# Altium PCB SYNCBOX.PcbDoc (part 5 of 6)
Units mil, origin at the board's own origin, x right, y up, seen from the top; angles counter-clockwise.
Board outline 8392.2 x 6163.59 mil, 6 copper layers (L1, L2, L3, L4 (PWR), L5, L6), stack 60.709 mil thick; 316 components, 422 nets, 1421 pads, 499 vias.
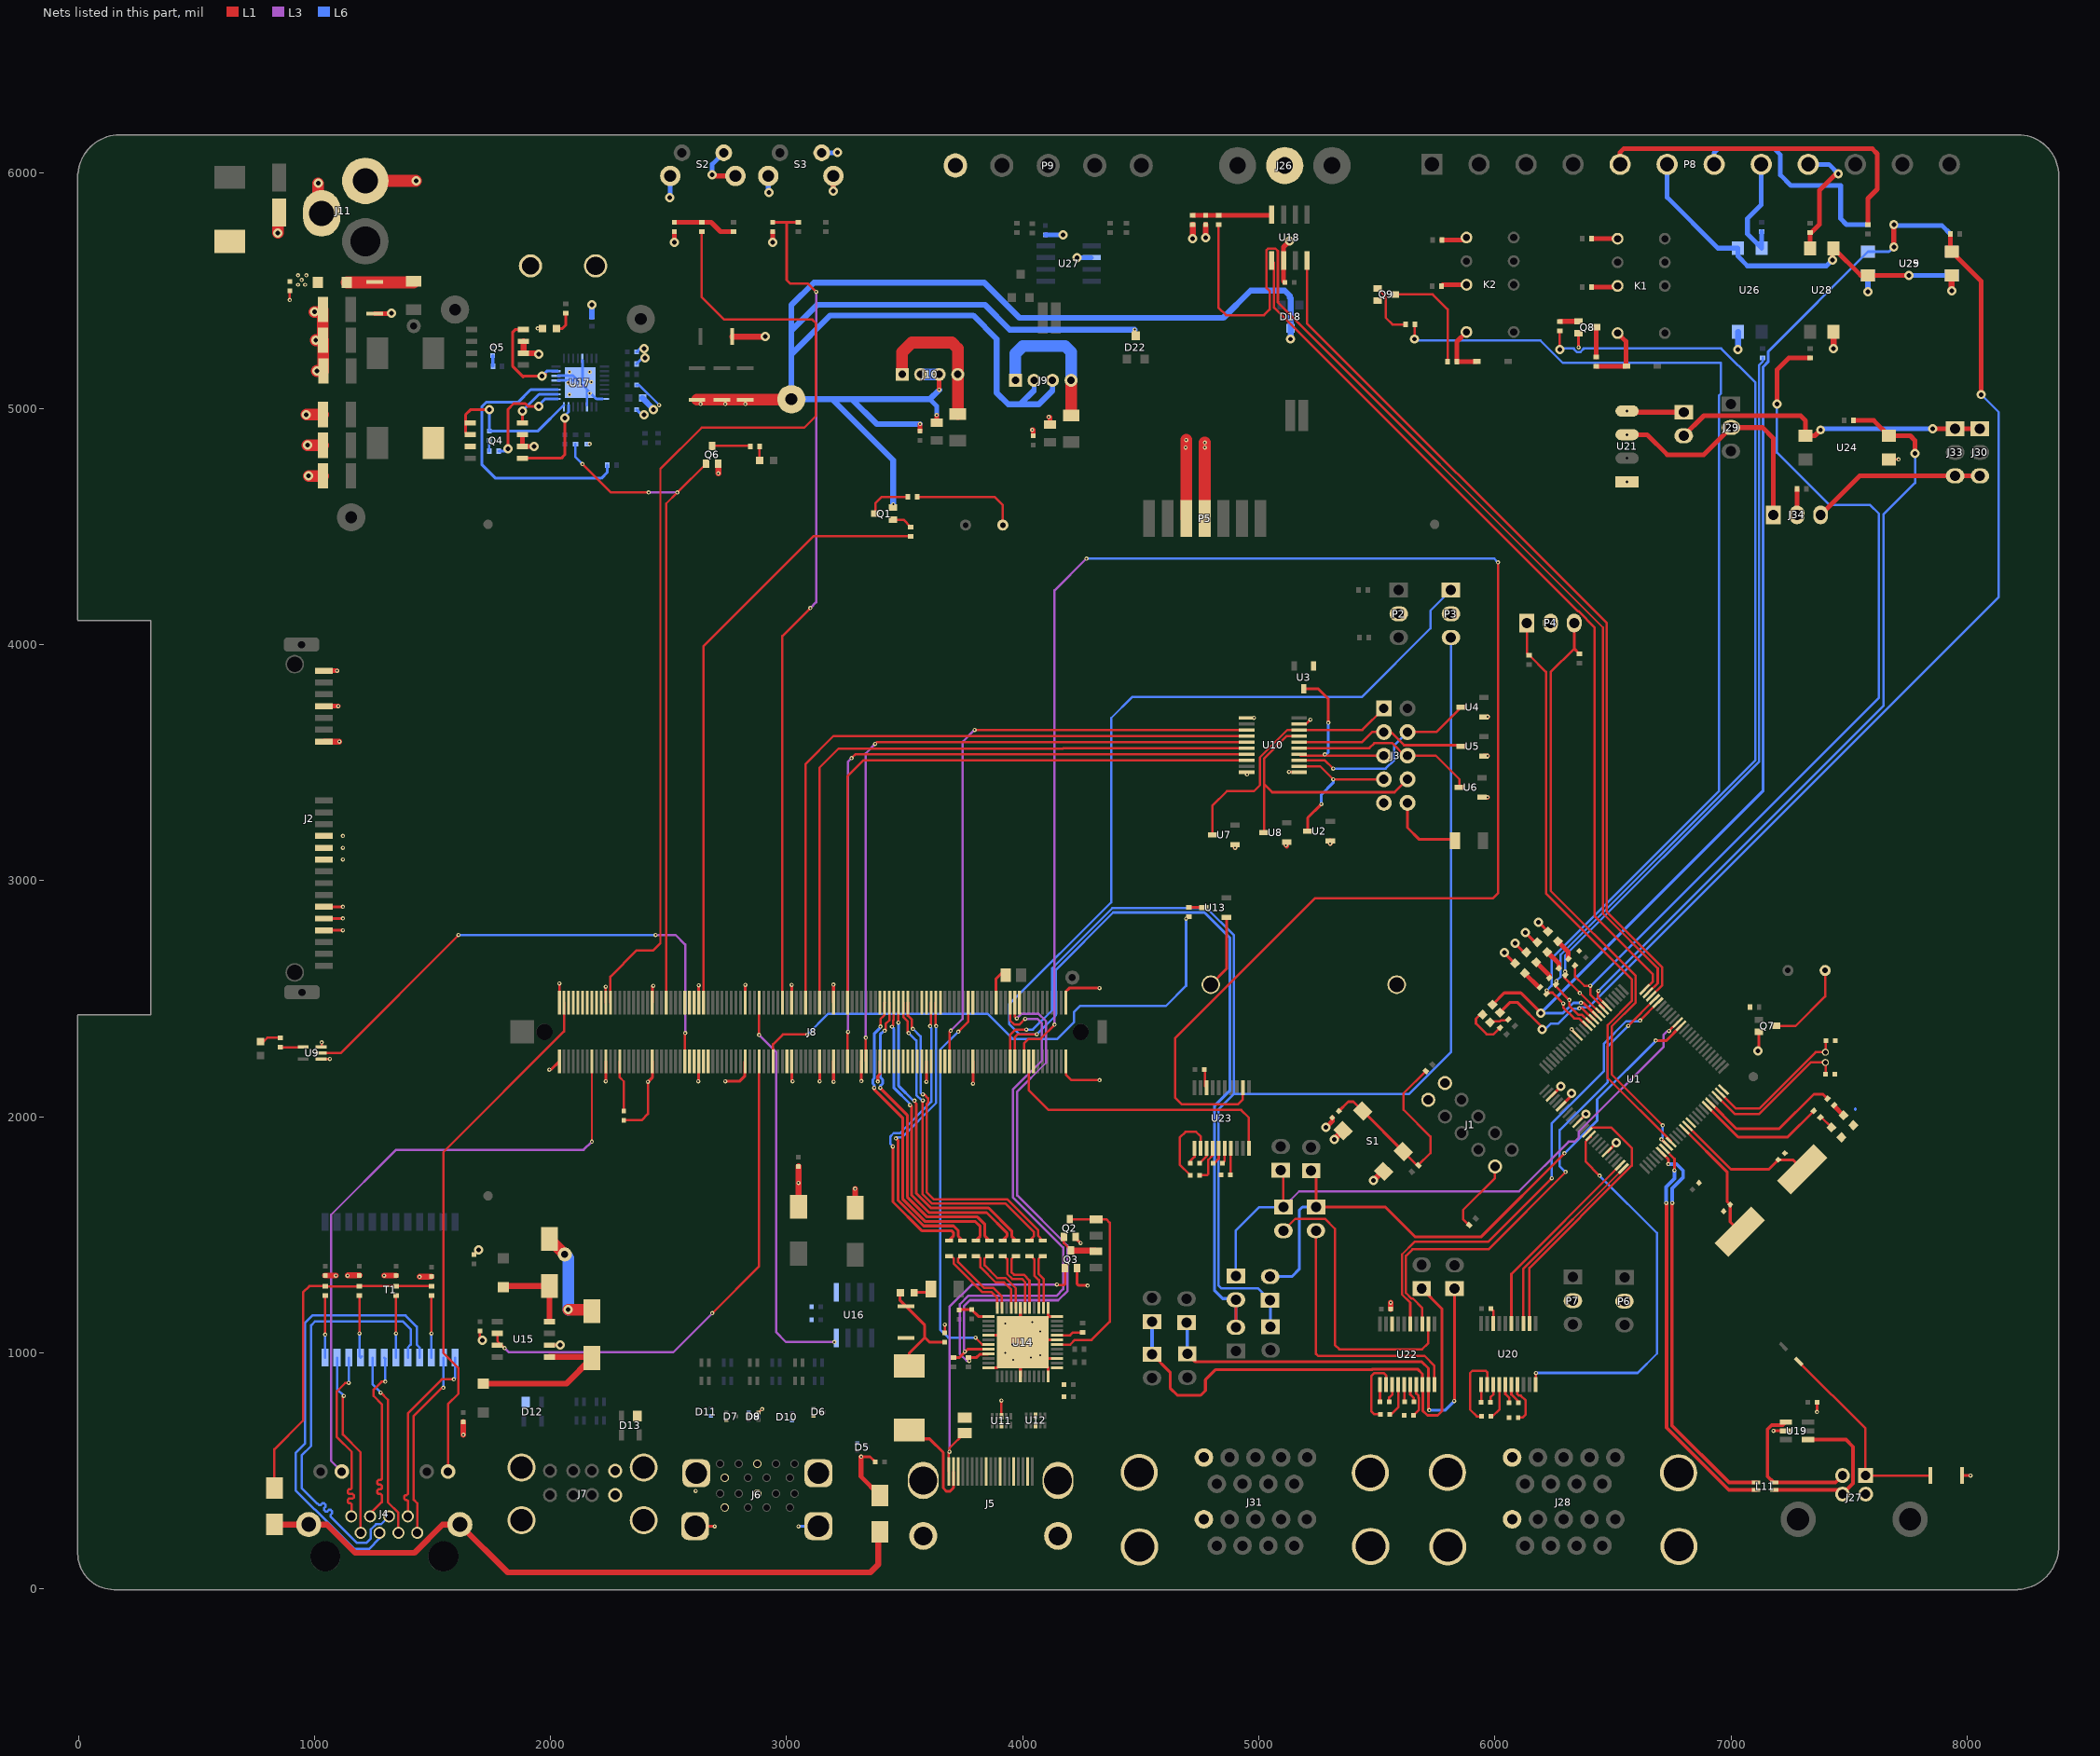
[diagram p7: the nets of this part, all layers, seen from the top]

## Via types
v1: diameter 17.72, hole 7.87, L1 to L6, tented both sides, 369 vias
v2: diameter 39.37, hole 19.68, L1 to L6, tented both sides, 116 vias
v3: diameter 236.22, hole 110.24, L1 to L6, 4 vias
v4: diameter 283.46, hole 125.98, L1 to L6, 4 vias
v5: diameter 472.44, hole 393.7, L1 to L6, 4 vias
v6: diameter 30, hole 15, L1 to L6, tented both sides, 2 vias

## Nets (pads, with @x,y where several pads share a name; then routed paths per layer and width w, separated by ;. In a path a pad name is that pad's centre, name@x,y a point inside that pad or via, vN(x,y) a via of type N, cw(c..) or ccw(c..) an arc to the next point about the centre after c; other vN are vias at no path point) (continued)
GND: BT1.2 C1.1 C2.2 C3.1 C4.1 C5.1 C6.1 C7.1 C8.1 C9.1 C10.1 C11.1 C12.1 C13.1 C15.2 C16.1 C17.1 C18.1 C19.1 C28.1 C29.1 C30.1 C31.1 C32.1 C33.1 C34.2 C35.2 C36.1 C37.1 C38.2 C39.2 C40.2 C41.1 C42.2 C43.1 C44.1 C45.1 C48.1 C49.1 C50.1 C51.1 C52.1 C53.1 C54.2 C55.1 C56.1 C57.1 C58.1 C59.1 C60.1 C61.1 C62.1 C63.1 C64.2 C65.1 C66.1 C67.2 C69.2 C70.1 C72.1 C74.1 C75.2 C77.2 C79.1 C80.1 C82.1 C83.1 D1.2 D2.2 D5.3 D6.3 D7.3 D8.3 D9.3 D10.3 D11.3 D12.1 D13.1 D16.1 D17.2 D18.3 D22.3 D24.2 D25.2 D28.2 D29.2 J1.9 J1.10 J2.1 J2.4 J2.7 J2.11 J2.12 J2.13 J2.17 J2.18 J2.19 J3.9 J5.2 J5.5 J5.8 J5.11 J5.17 J5.MTG1 J5.MTG2 J5.MTG3 J5.MTG4 J6.4 J6.7 J6.13 J6.16 J6.19 J6.21 J6.22 J6.23 J7.4 J7.8 J7.9 J7.10 J7.11 J7.12 J8.A1 J8.A11 J8.A21 J8.A31 J8.A41 J8.A51 J8.A57 J8.A60 J8.A66 J8.A70 J8.A80 J8.A90 J8.A110 J8.B1 J8.B11 J8.B21 J8.B31 J8.B41 J8.B51 J8.B60 J8.B70 J8.B80 J8.B90 J8.B100 J8.B110 J9.2 J9.3 J10.2 J10.3 J11.2 J11.3 J26.2 J27.4 J28.5 J28.14 J28.19 J28.20 J28.21 J28.22 J31.5 J31.14 J31.19 J31.20 J31.21 J31.22 P2.2 P3.2 P4.2 P5.3 P5.4 P6.2 P7.2 P9.5 pad.5 Q1.2 Q2.2 Q3.2 Q4.2 Q4.3 Q5.2 Q5.3 Q6.2 Q7.2 Q8.2 Q9.2 R21.2 R30.2 R31.1 R34.1 R43.2 R47.1 S1.2 S2.1 S2.3 S2.4 S3.1 S3.3 S3.4 TP1.1 U1.15 U1.28 U1.31 U1.36 U1.45 U1.65 U1.75 U2.1 U3.1 U4.1 U5.1 U6.1 U7.1 U8.1 U9.1 U9.3 U10.1 U10.10 U10.11 U10.19 U11.3 U11.8 U12.3 U12.8 U14.1 U14.5 U14.12 U14.18 U14.24 U14.25 U14.27 U14.31 U14.36 U14.37 U14.43 U14.49 U15.6 U16.1 U17.8 U17.11 U17.21 U17.22 U17.29 U17.33 U18.2 U19.2 U20.1 U20.18 U21.1 U22.1 U22.18 U23.1 U23.18 U24.3 U25.3 U26.2 U27.6 U28.2 U29.3 | length 20254.8
  L1 w10: v1(895,5460) C62.1@895,5500 ; U9.1@1028,2244.41 1064.41,2244.41 v1(1065,2245) ; U9.3@1028,2295.59 1030,2297.59 v1(1030,2315) ; C30.1@1700,1093.27 1700,1062.64 v2(1710,1052.64) ; J8.B1@2037,2484 v1(2037,2565) ; J8.B11@2233.85,2484 v1(2233.85,2551.15) ; C13.1@2310,1985.32 2385.32,1985.32 2412.4,2012.4 v1(2412.4,2148) ; D8.3@2880,743.78 D8.3@2880,746.5 2880.5,746.5 v1(2896,762) ; C29.1@3670,1084.68 v1(3670,1120) ; U11.8@3910,732.14 3910,797.95 v1(3910.08,798.03) ; J8.A110@4182.67,2235.34 4182.7,2178 4205.7,2155 v1(4325,2155) ; C80.1@4710.31,1804 4710.31,1813.32 4727.82,1830.82 U23.1@4727.82,1866 ; C79.1@4768.69,2200 4772.19,2196.5 4772.19,2130.68 U23.18@4779,2123.87 ; v1(5128,3461) 5169.84,3461 U10.11@5171,3459.84 ; U10.19@5171,3664.57 5200.91,3664.57 v1(5219,3682.66) ; C75.2@5513.31,793 5513.31,864.68 U22.1@5513.64,865 ; U20.1@5942.05,866.13 5942.31,865.86 C70.1@5942.31,791 ; C69.2@5983.69,1188 5993.23,1178.46 U20.18@5993.23,1124 ; v1(6324.79,2371.06) 6324.79,2369.53 U1.15@6350.03,2344.29 ; U24.3@7670,4785 v1(7710,4785)
  L1 w12: J2.19@1040,2790 v1(1120,2790) ; J2.18@1040,2840 v1(1120,2840) ; J2.17@1040,2890 v1(1120,2890) ; C37.1@1675,1417.32 v2(1694.68,1437.01) ; v1(1995,2200) 2001.66,2200 J8.A1@2037,2235.34 ; U15.6@1995.24,1032.64 v2(2040,1032.64) ; v1(2233.85,2150) J8.A11@2233.85,2235.34 ; v1(2412.4,2148) 2430.7,2166.3 J8.A21@2430.7,2235.34 ; J8.B21@2430.7,2484 2430.7,2550.7 v1(2435,2555) ; J6.21@2611.97,266.26 2693.74,266.26 v1(2695,265) ; v1(2625,2150) 2627.55,2152.55 J8.A31@2627.55,2235.34 ; J8.B31@2627.55,2484 v1(2627.55,2557.55) ; v1(2740,2150) 2740.31,2150.31 2800,2150.31 2823.12,2173.43 2823.12,2234.06 J8.A41@2824.4,2235.34 ; J8.B41@2824.4,2484 v1(2824.4,2559.4) ; J8.A51@3021.25,2235.34 3021.25,2153.75 v1(3025,2150) ; J8.B51@3021.25,2484 v1(3021.25,2558.75) ; J8.A57@3139.36,2235.34 3139.36,2150.64 v1(3140,2150) ; J8.A60@3198.42,2235.34 3198.42,2148.78 v1(3199.2,2148) ; J8.B60@3198.42,2484 v1(3198.42,2559.92) ; v1(3315,560) 3353.27,560 C8.1@3375.63,537.64 ; v1(3316.53,2151.53) J8.A66@3316.53,2235.34 ; v1(3386,2149) 3386,2172.42 3393.99,2180.41 3393.99,2234.06 J8.A70@3395.27,2235.34 ; v1(3592.12,2148.48) J8.A80@3592.12,2235.34 ; C18.1@3731,1180.68 3732.95,1182.64 C19.1@3783.94,1182.64 3812.07,1154.52 3825,1154.52 3826.25,1153.27 U14.1@3855,1153.27 ; v1(3788.97,2141.03) J8.A90@3788.97,2235.34 ; U14.12@3855,936.73 3855,936.91 3891.91,936.91 U14.49@3990.16,1035.16 ; U14.5@3855,1074.53 3970.47,1074.53 U14.49@3990.16,1054.84 ; U14.18@3990.16,900 U14.49@3990.16,1035.16 ; U14.43@3990.16,1190 U14.49@3990.16,1054.84 ; U14.24@4108.27,900 4108.09,900.17 4108.09,936.91 U14.49@4068.9,976.1 ; U14.37@4108.27,1190 U14.49@4108.27,1153.27 ; U14.27@4145,976.1 U14.49@4068.9,976.1 ; U14.31@4145,1054.84 U14.49@4009.84,1054.84 ; U14.36@4145,1153.27 U14.49@4108.27,1153.27 ; J8.B110@4182.67,2484 4182.67,2530.76 4196.91,2545 v1(4325,2545) ; Q2.2@4225,1491.5 4225,1485 v1(4245,1465) ; Q3.2@4230.59,1359.1 4230.59,1291.41 4235.5,1286.5 4273.5,1286.5 v1(4275,1285) ; v2(6040,2695) D29.2@6085,2650 ; v2(6085,2735) 6123.24,2696.76 D28.2@6133.24,2696.76 ; v2(6130,2780) 6170,2740 D24.2@6180,2740 ; v2(6185,2825) D25.2@6225,2785 ; U1.28@6238.67,2087.06 6280,2128.39 v2(6280,2130) ; U1.31@6280.43,2045.3 6320,2084.87 6319.87,2085 6325,2090.13 v2(6325,2100) ; U1.36@6350.03,1975.71 v2(6386.1,2011.77) ; v1(6355,5260) Q8.2@6355,5318.82 ; U1.45@6475.3,1850.43 6514.87,1890 v2(6515,1890) ; C6.1@6863.92,1721.08 C6.1@6865,1720 ; v2(7115,2279.8) 7117.6,2282.4 Q7.2@7117.6,2359.41 ; v1(7180,670) U19.2@7233,670 ; v1(7365,750) C66.1@7365,790 ; C67.2@7979,480 v1(8015,480) ; U14.49@3990.16,1035.16 U14.49@4000,1045 ; U14.49@3990.16,1054.84 U14.49@4000,1045 ; U14.49@4000,1045 U14.49@4068.9,976.1 ; U14.49@4000,1045 U14.49@4009.84,1054.84 ; U14.49@4009.84,1054.84 U14.49@4108.27,1153.27
  L1 w20: J2.4@1040,3739.8 v1(1100,3739.8) ; J2.1@1040,3889.8 v1(1095,3889.8) ; C63.1@1255,5403 1323,5403 v2(1325,5405) ; Q4.3@1880.24,4890 Q4.2@1880.24,4840 v2(1930,4840) ; v2(2525,5705) C58.1@2525,5750 ; v2(2685,5990) 2689.02,5985.98 S2.3@2782.99,5985.98 ; v2(2940,5705) C59.1@2940,5750 ; v2(3197.01,5922.01) 3197.99,5922.01 S3.3@3197.99,5985.98 ; v1(3315,560) 3315,476.18 C15.2@3395,396.18 ; C61.1@3565,4905 v1(3565,4935) ; C60.1@3635,4940 v1(3635,4972.6) ; v1(3646.26,5080) J10.3@3646.26,5145 ; v1(4040,4910) 4045,4910 C57.1@4045,4885 ; v1(4110,4965) 4115,4965 C56.1@4115,4932.4 ; v1(4900,3140) U7.1@4900,3152.32 ; C65.1@5110,5535 5105,5540 U18.2@5105,5628 5105,5685 v2(5130,5710) ; v1(5115,3150) 5118,3147 U8.1@5118,3163.66 ; v2(5285,1955) 5311.08,1981.08 C7.1@5311.08,1996.08 ; v1(5303,3157) U2.1@5303,3168.66 ; U6.1@5946,3353.66 v1(5968.66,3353.66) ; U5.1@5953,3528.66 v1(5968.66,3528.66) ; U4.1@5953,3693.66 5968.66,3693.66 v1(5970,3695)
  L1 w25: J2.7@1040,3589.8 v1(1105,3589.8) ; C9.1@1045,1327.95 1089.68,1327.95 v1(1090,1327.64) ; v1(1140,1327.64) 1140.63,1328.27 C10.1@1190,1328.27 ; v1(1295,1327.64) 1295.32,1327.95 C11.1@1345,1327.95 ; v1(1445,1322.64) 1445.32,1322.95 C12.1@1495,1322.95 ; v1(1630,652.64) C36.1@1630,707.95 ; Q5.3@1885.47,5285 Q5.2@1885.47,5235 1945,5235 v2(1950,5230) ; v1(2710.59,4725.59) Q6.2@2710.59,4767.6 ; C42.2@2769,5305 v2(2910,5305) ; C38.2@3050,1619.5 v1(3050,1720) C31.1@3050,1790.32 ; C39.2@3290,1614.5 v1(3290,1695) ; v2(4720,5720) R43.2@4720,5780 ; v2(4775,5725) C64.2@4775,5780 ; v2(5320,1905) S1.2@5356.48,1941.48 ; v2(5485,1730) 5523.88,1768.88 S1.2@5529.08,1768.88 ; C74.1@5558.69,1186 v1(5558.69,1212.32) ; v2(7435,5255) U28.2@7435,5325 ; v2(7935,5500) U25.3@7935,5565
  L1 w50: v2(845,5745) 845,5825.2 D16.1@850,5830.2 ; v2(965,4975) C48.1@1036,4975 ; v2(970,4845) C49.1@1036,4845 ; v2(975,4715) C50.1@1036,4715 ; v2(1000,5410) 1025,5410 C53.1@1035,5420 1035,5291 C52.1@1036,5290 ; v2(1005,5290) C52.1@1036,5290 ; v2(1010,5160) C51.1@1037,5160 1036,5161 C52.1@1036,5290 ; v2(1015,5955) 1015,5799.92 1029.96,5784.96 J11.3@1029.96,5827.2 ; J11.2@1215,5965 v2(1430,5965) ; C34.2@1995,1482.14 pad.5@2052.14,1425 ; v2(2075,1182.64) 2169.5,1182.64 C35.2@2175,1177.14 ; C45.1@2620,5038 C44.1@2725,5038 C43.1@2825,5038 3018,5038 TP1.1@3020,5040 ; P5.3@4692.52,4535 v1(4692.48,4867.52) ; P5.4@4771.26,4535 v1(4771.26,4835) v1(4771.26,4856.26)
  L6 w8: R31.1@2155,4850.63 2164.37,4850.63 v1(2165,4850)
  L6 w10: U17.33@2125,5110 2154.53,5080.47 U17.11@2154.53,5015.51 ; C54.2@2364.37,5100 2375,5100 v1(2460,5015) ; v1(2896,762) v1@2898.81,764.81
  L6 w12: U17.21@2030.51,5119.84 U17.33@2115.16,5119.84 ; U17.22@2030.51,5139.53 2095.47,5139.53 U17.33@2115.16,5119.84 ; U17.29@2134.84,5204.49 2134.84,5119.84 U17.33@2125,5110 U17.33@2115.16,5119.84 ; U17.33@2154.53,5080.47 2193.9,5041.1 U17.8@2219.49,5041.1 ; R34.1@2364.37,5190 2389.37,5215 v2(2400,5215) ; C41.1@2365,4995 2385,4975 v2(2395,4975) ; C55.1@2365,5240 2380,5255 v2(2395,5255) ; v1(3050,265) 3051.26,266.26 J6.19@3134.29,266.26 ; 7526.78,2030.94 7526.78,2033.43
  L6 w20: v2(2505,5895) 2507.01,5897.01 S2.4@2507.01,5985.98 ; v2(2685,5990) 2685,6035.43 S2.1@2733.58,6084.02 ; S3.4@2922.01,5985.98 2922.01,5917.99 v2(2925,5915) ; S3.1@3148.58,6084.02 3214.02,6084.02 v2(3215,6085) ; 3606.26,5040 3635,5011.26 v1(3635,4972.6) ; 4045.04,5075 4047.52,5072.52 J9.2@4047.52,5120 ; C83.1@4095,5735.63 v2(4170.63,5735.63) ; 4125,5075 4126.26,5076.26 J9.3@4126.26,5120 ; v2(4230,5640) U27.6@4292,5640
  L6 w25: R30.2@2175,5389.37 v2(2175,5440) ; C40.2@2389.06,5045 2435,4999.06 v2(2435,4995) ; v1(3451.75,4595) 3451.75,4781.25 3193,5040 ; v1(3565,4935) 3381,4935 3276,5040 ; v1(3646.26,5080) 3606.26,5040 3276,5040 ; 4045.04,5075 3988.04,5018 ; 4125,5075 4068,5018 3988.04,5018 ; v1(4474,5335) 3945,5335 3840,5440 3130,5440 3020,5330 ; v2(5135,5295) D18.3@5135,5340.79 5135,5468.04 5131.91,5471.13 5131.91,5478 5109.91,5500 4965,5500 4850,5385 3986,5385 3837,5534 3115,5534 3020,5439 3020,5330 ; v2(7030,5250) U26.2@7030,5325.67 ; v2(7580,5495) 7580.67,5495.67 U29.3@7580.67,5565 ; 3020,5230 3020,5330 ; 3020,5230 TP1.1@3020,5040 3193,5040 ; 3020,5230 3185,5395 3790,5395 3890,5295 3890,5067 3939,5018 3988.04,5018 ; 3193,5040 3276,5040
  L6 w50: pad.5@2052.14,1425 pad.5@2060,1417.14 2075,1402.14 v2(2075,1182.64) ; J10.2@3567.52,5145 J10.3@3646.26,5145
  other v1: 2615,415 3960,970 4035,980 4075,990 3925,1000 3955,1035 4075,1090 3925,1125 4040,1130 1120,3090 1120,3140 1120,3190 4950,3450 4980,3690 4690,4835 2635,5020 2740,5020 2825,5020 2080,5060 2165,5065 2075,5110 2172.46,5112.92 2080,5155 2165,5155 1945,5340
GND_EXT: P8.6 U25.2 U26.3 U28.3 U29.2 | length 1589.7
  L1 w20: v2(7430,5630) 7430,5674.33 U28.3@7435,5679.33 7549.33,5565 U25.2@7580.67,5565 v2(7755,5565)
  L6 w20: P8.6@6730,6035 6730,5895 6945,5680 U26.3@7030,5680 7030,5645 7070,5605 7405,5605 v2(7430,5630) ; v2(7755,5565) U29.2@7935,5565
GPI1opto: P8.5 R61.1 | length 1472.1
  L1 w20: P8.5@6530.73,6035 6530.73,6086.45 6545,6100.73 7599.27,6100.73 7620,6080 7620,5930 7580,5890 R61.1@7580,5779.69
GPI2opto: P8.7 R75.1 | length 971.5
  L6 w20: P8.7@6929.27,6035 6929.27,6084.27 6945.73,6100.73 7184.27,6100.73 7210,6075 7210,5990 7255,5945 7465,5945 7465,5805 7490,5780 R75.1@7580,5780
GPIO0: R48.1 U1.6 U24.4 | length 3263.7
  L1 w10: v1(6438.91,2533.78) 6435.94,2530.81 6435.94,2508.94 U1.6@6475.3,2469.57
  L1 w20: R48.1@7520,4950 7605,4950 U24.4@7670,4885 7760,4885 7780,4865 v2(7780,4810)
  L6 w10: v1(6438.91,2533.78) 7645.59,3740.46 7645.59,4551.41 7780,4685.82 v2(7780,4810)
GPIO1: R62.1 R65.2 U1.8 | length 3183.5
  L1 w10: R65.2@6293.92,2596.08 6293.92,2591.08 v1(6360,2525) 6440.28,2444.72 6447.47,2444.72 U1.8@6447.47,2441.73 ; v1(6298,2615) 6298,2602 R65.2@6298.92,2601.08
  L6 w10: v1(6298,2615) 6298,2683.68 7119.69,3505.37 7119.69,5184.71 7135,5200.02 R62.1@7135,5215.31
GPIO2: R66.2 R73.1 U1.7 | length 3810.5
  L1 w10: R66.2@6338.92,2641.08 6338.92,2595.08 6379,2555 v1(6404,2555) 6404,2517.67 6461.38,2460.29 U1.7@6461.38,2455.65
  L1 w20: v2(7195,5020) 7195,5165 7245.32,5215.31 R73.1@7335,5215.31
  L6 w10: v1(6404,2555) 6407,2555 7627.32,3775.32 7627.32,4554.68 7589,4593 7416,4593 7195,4814 v2(7195,5020)
GPIO3: R56.1 R69.2 U1.11 | length 4105.2
  L1 w10: R69.2@6258.92,2561.08 6258.92,2551.08 v1(6315,2495) 6315,2471 6353.19,2432.81 6368.23,2432.81 6401.07,2399.97 U1.11@6405.71,2399.97 U1.11@6405.71,2400.68 ; v2(6275,5250) R56.1@6275,5330.31
  L6 w10: v1(6260,2575) 6278.24,2593.24 6278.24,2686.41 7103.79,3511.96 7103.79,5110 6959.02,5254.76 6374.76,5254.76 6374.76,5251.81 6363.19,5240.24 6346.81,5240.24 6335.24,5251.81 6335.24,5254.76 6279.76,5254.76 v2(6275,5250)
GPIO4: R57.1 R70.2 U1.12 | length 4599.1
  L1 w10: v2(5660,5295) R57.1@5660,5355 ; R70.2@6223.92,2526.08 6243.92,2526.08 v1(6290,2480) 6290,2463 6336.09,2416.91 6357,2416.91 6387.86,2386.05 U1.12@6391.79,2386.05
  L6 w10: v2(5660,5295) 5665.91,5289.09 6192.64,5289.09 6288.16,5193.58 6957.3,5193.58 6957.3,5063.59 6949.72,5056.01 6949.72,3380.39 6240.24,2670.9 6240.24,2555.24 v1(6220,2535)
GPIO5: D26.2 R59.1 U1.10 U25.4 | length 4646.5
  L1 w10: v1(6358,2459) 6370,2459 6415.11,2413.89 U1.10@6419.63,2413.89
  L1 w12: D26.2@6021.76,2441.76 6065,2485 6095,2485 6200,2380 v2(6200,2370)
  L1 w20: R59.1@7930.63,5740 7930.63,5669.37 U25.4@7935,5665 8060,5540 v2(8060,5060)
  L6 w10: v2(6200,2370) 6211.74,2370 6237.33,2395.59 6268.86,2395.59 6330.6,2457.33 6356.33,2457.33 v1(6358,2459) 6362.24,2463.24 6396.31,2463.24 8135,4201.92 8135,4985 v2(8060,5060)
GPIO6: D27.2 R72.1 U1.9 U29.4 | length 4808.3
  L1 w12: D27.2@5990,2475 6040,2525 6110,2525 v2(6195,2440) ; v1(6365,2483) 6375.13,2483 6430.32,2427.81 U1.9@6433.55,2427.81
  L1 w20: v2(7690,5685) v2(7690,5780)
  L6 w12: v1(6365,2483) 6332.36,2483 6289.36,2440 v2(6195,2440) 7136.6,3381.6 7136.6,5177.71 7158.72,5199.82 7158.72,5243.05 U29.4@7580.67,5665 7670,5665 v2(7690,5685)
  L6 w20: v2(7690,5780) 7695,5775 7895,5775 R72.1@7930,5740
GPO1opto: P8.8 R58.1 U26.4 | length 474.1
  L6 w20: P8.8@7128.55,6035 7128.55,5863.55 7070,5805 7070,5740 U26.4@7130,5680 R58.1@7130,5750
GPO2opto: P8.9 R71.1 U28.4 | length 517.8
  L1 w20: U28.4@7335,5679.33 R71.1@7335,5745.31 7339.78,5745.31 7375,5780.54 7375,5925 7445,5995 v2(7455,5995)
  L6 w20: P8.9@7327.82,6035 7415,6035 v2(7455,5995)
HDA_BITCLK: J8.A32
HDA_RST#: J8.A30
HDA_SDIN0: J8.B30
HDA_SDIN1: J8.B29
HDA_SDIN2: J8.B28
HDA_SDOUT: J8.A33
HDA_SYNC: J8.A29
HDMI_5V: D4.1 J5.18 | length 458.6
  L1 w12: D4.1@3519,673.17 3556.51,635.67 3605.33,635.67 3663,578 3663,427 3677,413 3691,413 3706.52,428.52 J5.18@3706.52,497
HDMI_AUX_N: J8.B99 R17.1 U14.8 | length 2327
  L1 w9.84: J8.B99@3966.13,2484 3966.13,2425.69 v1(3975,2416.82)
  L1 w12: R17.1@3706,979.68 3730.51,979.68 ; 3731.31,979.68 3730.51,979.68 ; U14.8@3855,1015.66 3766.49,1015.66 3730.51,979.68
  L3 w10: v1(3754.86,1005.29) 3752,1002.43 3752,1198.82 3776.18,1223 4150,1223 4190,1263 4189.46,1263 4189.46,1454.13 3977,1666.59 3977,2107.31 4098.64,2228.95 4098.64,2230.36 4098.87,2230.6 4098.87,2403.4 4098.64,2403.64 4098.64,2405.05 4066.69,2437 3995.18,2437 v1(3975,2416.82)
HDMI_AUX_P: J8.B98 R16.1 U14.9 | length 2319.5
  L1 w9.84: J8.B98@3946.45,2484 3946.45,2408.55 3965,2390 3985,2390 v1(4010,2415)
  L1 w12: R16.1@3770,980.68 3804.77,980.68 3818.09,994.01 3853.22,994.01 U14.9@3855,995.79
  L3 w10: v1(3773.07,965.92) 3763.08,965.92 3733.13,995.87 3733.13,1103.46 3734.13,1104.46 3734.13,1206.22 3768.78,1240.87 4142.6,1240.87 4171.58,1269.86 4171.58,1446.72 3958.13,1660.18 3958.13,2115.13 4081,2238 4081,2396 4062,2415 v1(4010,2415)
HDMI_D0_N: C23.1 U14.44 | length 308
  L1 w10: C23.1@3858.14,1409.5 3848.5,1409.5 3839,1400 3839,1370.28 3892.4,1316.87 3927.4,1316.87 3970.47,1273.81 U14.44@3970.47,1190
HDMI_D0_P: C22.1 U14.45 | length 307.8
  L1 w10: C22.1@3801.43,1409.5 3811.63,1409.5 3821.13,1400 3821.13,1362.87 3885,1299 3920,1299 3950.79,1268.21 U14.45@3950.79,1190
HDMI_D1_N: C25.1 U14.41 | length 288
  L1 w10: C25.1@3971.57,1409.5 3964.5,1409.5 3952,1397 3952,1341.87 3963,1330.87 4004.15,1330.87 4028.62,1306.4 4028.62,1220.91 4029.53,1220 U14.41@4029.53,1190
HDMI_D1_P: C24.1 U14.42 | length 287.7
  L1 w10: C24.1@3914.86,1409.5 3921.63,1409.5 3934.13,1397 3934.13,1334.47 3955.6,1313 3996.75,1313 4010.75,1299 4010.75,1220.91 4009.84,1220 U14.42@4009.84,1190
HDMI_D2_N: C27.1 U14.38 | length 238.5
  L1 w10: C27.1@4085,1409.5 4080.5,1409.5 4067,1396 4067,1335.28 4088.58,1313.69 U14.38@4088.58,1190
HDMI_D2_P: C26.1 U14.39 | length 240.6
  L1 w10: C26.1@4028.29,1409.5 4035.63,1409.5 4049.13,1396 4049.13,1327.87 4068.9,1308.1 U14.39@4068.9,1190
HDMI_D3_N: C21.1 U14.47 | length 331.8
  L1 w10: C21.1@3744.71,1409.5 3736.5,1409.5 3726,1399 3726,1384.87 3835.24,1275.64 3874.36,1275.64 3911.42,1238.58 U14.47@3911.42,1190
HDMI_D3_P: C20.1 U14.48 | length 332.4
  L1 w10: C20.1@3688,1409.5 3697.63,1409.5 3708.13,1399 3708.13,1377.47 3827.83,1257.76 3866.96,1257.76 3891.73,1232.99 U14.48@3891.73,1190
HDMI_HPD: J8.B89 U14.7 | length 1666.6
  L1 w9.84: v1(3727,2361) 3769.28,2403.28 J8.B89@3769.28,2484 ; v1(3800,1065) 3800,1064.42 3799.56,1063.98 3828.37,1035.16 U14.7@3855,1035.16
  L6 w9.84: v1(3727,2361) 3650.31,2284.31 3650.31,1099 3684.31,1065 v1(3800,1065)
HDMI_P0_N: C23.2 J8.B72 | length 1354.9
  L1 w10: v1(3415.52,2364.48) 3419.16,2368.12 3419.16,2393.16 3434.64,2408.64 J8.B72@3434.64,2484
  L1 w12: v1(3396,2123) 3396,2122.11 3510.78,2007.33 3510.78,1660.75 3595.66,1575.87 3808.08,1575.87 3839.72,1544.23 3839.72,1494.92 C23.2@3858.14,1476.5
  L6 w12: v1(3396,2123) 3399,2123 3396,2126 3396,2129.64 3406.76,2140.4 3406.76,2157.6 3396,2168.36 3396,2349 3411.48,2364.48 v1(3415.52,2364.48)
HDMI_P0_P: C22.2 J8.B71 | length 1348.6
  L1 w10: v1(3397.43,2382.57) 3397.43,2414.43 3406.09,2423.09 3406.28,2423.09 3412.67,2429.48 3412.67,2429.67 3413.67,2430.67 3413.67,2482.72 J8.B71@3414.95,2484
  L1 w12: v1(3370.41,2123) 3370.41,2116.44 3490.91,1995.95 3490.91,1652.52 3587.43,1556 3799.85,1556 3819.85,1536 3819.85,1494.92 C22.2@3801.43,1476.5
  L6 w12: v1(3370.41,2123) 3370.41,2135.23 3365.24,2140.4 3365.24,2157.6 3370.41,2162.77 3370.41,2351.52 3397.43,2378.53 v1(3397.43,2382.57)
HDMI_P1_N: C25.2 J8.B74 | length 1310.5
  L1 w10: J8.B74@3472.92,2444 3472.92,2420.84 3472.73,2420.65 3472.73,2409.03 3473,2408.76 v1(3473,2399)
  L1 w12: v1(3541.1,2068.1) 3541.1,2064.05 3549,2056.15 3549,1675.96 3611.09,1613.87 3855.51,1613.87 3953.15,1516.23 3953.15,1494.92 C25.2@3971.57,1476.5
  L6 w12: v1@3474.57,2390.43 3474.57,2130.57 3537.05,2068.1 v1(3541.1,2068.1)
HDMI_P1_P: C24.2 J8.B73 | length 1323.4
  L1 w10: v1(3445.65,2381.95) 3450.54,2386.84 3450.54,2407.28 3453.04,2409.78 J8.B73@3453.04,2444
  L1 w12: v1(3523,2050) 3529.13,2043.87 3529.13,1667.73 3602.86,1594 3847.28,1594 3933.28,1508 3933.28,1494.92 C24.2@3914.86,1476.5
  L6 w12: v1(3445.65,2381.95) 3454.7,2372.9 3454.7,2122.34 3523,2054.04 v1(3523,2050)
HDMI_P2_N: C27.2 J8.B76 | length 1436.5
  L1 w10: J8.B76@3513.38,2484 3513.38,2429 3531,2411.38 3531,2377 v1(3535,2373) ; v1(3577,2095) 3582.14,2095 3598.73,2078.41 3598.73,2060.41 3593,2054.68 3593,1902 3593.13,1901.87 3593.13,1681.02 3624.27,1649.87 3935.11,1649.87 4065.58,1519.4 4065.58,1495.92 C27.2@4085,1476.5
  L6 w10: v1(3535,2373) 3566.87,2341.13 3566.87,2101 3572.87,2095 v1(3577,2095)
HDMI_P2_P: C26.2 J8.B75 | length 1431.7
  L1 w10: J8.B75@3493.69,2484 3493.69,2423.41 3513.13,2403.97 3513.13,2358.68 v1(3516.9,2354.9) ; v1(3577,2069.41) 3575.13,2067.54 3575.13,1884.38 3575.25,1884.25 3575.25,1673.62 3616.87,1632 3927.71,1632 4047.71,1512 4047.71,1495.92 C26.2@4028.29,1476.5
  L6 w10: v1(3516.9,2354.9) 3549,2322.81 3549,2092.27 3571.86,2069.41 v1(3577,2069.41)
HDMI_P3_N: C21.2 J8.B82 | length 1283.3
  L1 w10: J8.B82@3631.49,2484 3631.49,2385.37 v1(3632.86,2384)
  L1 w12: v1(3462.17,1909.05) 3471.22,1900 3472,1900 3472,1884.15 3472.73,1883.42 3472.73,1864.58 3472,1863.85 3472,1646.11 3580.23,1537.87 3706.65,1537.87 3726.29,1518.23 3726.29,1494.92 C21.2@3744.71,1476.5
  L6 w10: v1(3462.17,1909.05) 3466.03,1912.91 3487.18,1912.91 3632.76,2058.48 3632.76,2165.31 3632.86,2165.42 v1(3632.86,2384)
HDMI_P3_P: C20.2 J8.B81 | length 1296.2
  L1 w10: v1(3607.27,2384) 3607.27,2389.14 3611.8,2393.68 J8.B81@3611.8,2484
  L1 w12: v1@3450,1878.78 v1(3450,1874) 3450,1640 3572,1518 3698.42,1518 3706.42,1510 3706.42,1494.92 C20.2@3688,1476.5
  L6 w10: v1(3450,1874) 3439.44,1884.56 3439.44,1916.32 3440.44,1917.32 3440.44,1918.05 3453.17,1930.78 3479.78,1930.78 3612.88,2063.88 3612.88,2159.91 3612.13,2160.67 3612.13,2374 3611.13,2375 3611.13,2380.14 v1(3607.27,2384)
LGATE2_3V3: Q5.4 U17.23 | length 434.5
  L1 w12: Q5.4@1885.47,5335 1850,5335 1840,5325 1840,5178.6 1883.6,5135 1886.69,5138.09 v2(1963.5,5138.09) 1963.5,5138.5 1970,5145 v2@1980,5145
  L6 w12: v2(1963.5,5138.09) 1963.5,5138.5 1984.21,5159.21 U17.23@2022.51,5159.21 U17.23@2030.51,5159.21
LID#: J8.A103
LPC_AD0: J8.B4
LPC_AD1: J8.B5
LPC_AD2: J8.B6
LPC_AD3: J8.B7
LPC_CLK: J8.B10
LPC_DRQ0#: J8.B8
LPC_DRQ1#: J8.B9
LPC_FRAME#: J8.B3
LPC_SERIRQ: J8.A50
LVDS_A0+: J8.A71
LVDS_A0-: J8.A72
LVDS_A1+: J8.A73
LVDS_A1-: J8.A74
LVDS_A2+: J8.A75
LVDS_A2-: J8.A76
LVDS_A3+: J8.A78
LVDS_A3-: J8.A79
LVDS_A_CK+: J8.A81
LVDS_BKLT_CTRL: J8.B83
LVDS_BKLT_EN: J8.B79
LVDS_I2C_CK: J8.A83
LVDS_I2C_DAT: J8.A84
LVDS_VDD_EN: J8.A77
MCT0: R9.1 T1.15 | length 262.8
  L1 w10: v1(1495,1082.64) R9.1@1495,1242.95
  L6 w10: T1.15@1495,980.14 v1(1495,1082.64)
MCT1: R7.1 T1.21 | length 272
  L1 w10: v1(1190,1082.64) R7.1@1190,1242.64 R7.1@1190,1242.95
  L6 w10: v1(1190,1082.64) 1190,985.14 T1.21@1195,980.14 T1.21@1200,985.14
MCT2: R8.1 T1.18 | length 262.8
  L1 w10: v1(1345,1082.64) R8.1@1345,1242.95
  L6 w9.84: T1.18@1345,980.14 v1(1345,1082.64)
MCT3: R6.1 T1.24 | length 263.1
  L1 w10: v1(1045,1077.64) R6.1@1045,1243.27
  L6 w10: T1.24@1045,980.14 v1(1045,1077.64)
MCT_CHASSIS: C14.1 C15.1 J4.13 J4.14 | length 2895.4
  L1 w25: C14.1@845.04,272.6 J4.14@975.32,272.6 1052.4,272.6 1172.36,152.64 1422.64,152.64 1542.6,272.6 J4.13@1615.47,272.6 1818.07,70 3355,70 3388.54,103.54 3388.54,249.09 C15.1@3395,242.64 C15.1@3395,242.64
MCU_CAN_INH: R42.2 U1.99 | length 4728.8
  L1 w10: R42.2@4830,5780 4830,5427 4861,5396 5022,5396 5045.59,5419.59 5045.59,5498.5 5033.09,5511 5033.09,5671.52 5039.48,5677.91 5070.52,5677.91 5080.91,5667.52 5080.91,5450.09 6458.09,4072.91 6458.09,2861.41 6690,2629.51 6690,2566.23 U1.99@6649.02,2525.25
MCU_CAN_RX: U1.98 U18.4 | length 3758.7
  L1 w10: U18.4@5205,5628 5205,5360 6474,4091 6474,2868 6709,2633 6709,2557.39 U1.98@6662.94,2511.33
MCU_CAN_TX: U1.100 U18.1 | length 3773.7
  L1 w10: U18.1@5055,5628 5065,5618 5065,5428 6350.72,4142.28 6353.56,4142.28 6423.09,4072.74 6423.09,2850.41 6669.75,2603.76 6669.75,2573.81 U1.100@6635.1,2539.17
MCU_CON_USB_D_N: J27.2 L11.4 U19.1 | length 631.2
  L1 w15: U19.1@7233,707.4 7220,694.41 7172.92,694.41 7155,676.49 7155,477.17 7181.42,450.75 L11.4@7184.42,450.75 7443.11,450.75 J27.2@7472.8,480.43
MCU_CON_USB_D_P: J27.3 L11.3 U19.4 | length 721.1
  L1 w15: L11.3@7181.42,419.25 L11.3@7184.42,419.25 7455.24,419.25 J27.3@7472.8,401.69 7517.7,446.59 7517.7,602.3 7487.4,632.6 U19.4@7327,632.6
MCU_TRANS_OUT_RX: J15.1 J20.1 J25.1 U22.9 | length 1957.4
  L1 w12: J25.1@4697,996 4731,962 5691,962 5718.36,934.64 U22.9@5718.36,865 v1@5718.36,758 ; v1(5828,796) 5830,798 J15.1@5830,1272
  L6 w12: v1(5722,758) 5723.36,756.64 5788.64,756.64 v1(5828,796)
  L6 w15: J20.1@4694,1129 4697,1126 J25.1@4697,996
MCU_TRANS_OUT_TX: J14.1 J19.1 J22.1 U22.8 | length 2286.8
  L1 w12: J22.1@4548,994 4624,918 4624,851 4655,820 4754,820 4774,840 4774,886 4817.69,929.69 5480.79,929.69 5482.77,931.68 5672.32,931.68 5692.77,911.23 U22.8@5692.77,865 5694.34,865 5694.34,755.34 5714.68,735 5758,735 5776,753 5776,1187 J14.1@5690,1273
  L6 w15: J19.1@4547,1132 4548,1131 J22.1@4548,994
MCU_TRANS_RX: J17.2 U22.10 | length 1125.1
  L1 w10: J17.2@5242,1518 5242,996 5251,987 5702,987 5743.95,945.05 U22.10@5743.95,865
MCU_TRANS_TX: J16.2 U22.12 | length 1244.9
  L1 w10: J16.2@5104.13,1517.28 5154.85,1568 5280,1568 5322,1526 5322,1034 5341,1015 5692,1015 5718.36,1041.36 U22.12@5718.36,1122.87
MCU_UART1_RX: U1.49 U20.15 | length 861.7
  L1 w10: U20.15@6070,1124 6070,1333.77 U1.49@6530.98,1794.75
MCU_UART1_TX: U1.50 U20.13 | length 832.3
  L1 w10: U20.13@6121.18,1124 6121.18,1357.11 U1.50@6544.9,1780.83
MCU_UART2_RX: U1.40 U20.10 | length 1653.8
  L1 w10: U20.10@6172.36,866.13 6174,867.76 v1(6174,915) ; U1.40@6405.71,1920.03 6405.71,1915.39 6384.33,1894.01 6384.33,1810.67 v1(6444,1751)
  L6 w10: v1(6174,915) 6605,915 6687,997 6687,1508 v1(6444,1751)
MCU_UART2_TX: U1.39 U20.12 | length 1157
  L1 w10: U20.12@6146.77,1124 6146.77,1359.5 6580.2,1792.93 6580.2,1868.06 6492.93,1955.33 6413.17,1955.33 U1.39@6391.79,1933.95
MCU_UART3_RX: U1.96 U22.15 | length 2039
  L1 w10: U22.15@5641.59,1122.87 5641.59,1212.63 5607.09,1247.12 5607.09,1417.59 5659.51,1470 5971,1470 v1(6241,1740) ; v1(6615,2407.71) U1.96@6690.78,2483.49
  L6 w10: v1(6241,1740) 6241,1972.74 6462.09,2193.83 6462.09,2310.71 6556.81,2405.42 6612.71,2405.42 v1(6615,2407.71)
MCU_UART3_TX: U1.97 U22.13 | length 2053.4
  L1 w10: U22.13@5692.77,1122.87 5692.77,1190.23 5652.4,1230.6 5646.11,1230.6 5623,1253.71 5623,1411 5651,1439 5973,1439 v1(6300,1766) ; v1(6565,2385.66) 6676.75,2497.41 U1.97@6676.86,2497.41
  L6 w10: v1(6300,1766) 6299,1766 6275.24,1789.76 6275.24,1944.18 6478,2146.94 6478,2298.66 v1(6565,2385.66)
MCU_UART4_RX: J13.2 J17.1 J24.1 U1.89 | length 2676
  L1 w12: J24.1@5222,1771 5242,1751 J17.1@5242,1618 5536,1618 5663,1491 5941,1491 v1(6295,1845) ; v1(6682,2323) 6726.69,2323 6788.21,2384.53 U1.89@6788.21,2386.05
  L6 w12: J13.2@5048,1323 5140,1323 5171,1354 5171,1604 5185,1618 J17.1@5242,1618 ; J24.1@5222,1771 J24.1@5242,1751 ; v1(6295,1845) 6433.59,1983.59 6433.59,2073.68 6682,2322.09 v1(6682,2323)
MCU_UART4_TX: J12.1 J16.1 J23.1 U1.90 | length 2641.9
  L1 w10: J23.1@5093,1774 5104.13,1762.87 J16.1@5104.13,1617.28 ; v1(6737.97,2363.64) U1.90@6774.29,2399.97
  L3 w10: J16.1@5104.13,1617.28 5170.85,1684 6101.58,1684 6312.16,1894.58 6312.33,1894.41 6337.67,1894.41 6355.59,1912.33 6355.59,1937.67 6355.42,1937.84 6715.24,2297.65 6715.24,2348.19 6730.69,2363.64 v1(6737.97,2363.64)
  L6 w10: J12.1@4903,1325 4903,1519 5001.28,1617.28 J16.1@5104.13,1617.28 ; J23.1@5104.13,1769.13 J23.1@5108,1773
MCU_USB_D_N: L11.1 U1.56 | length 1695.2
  L1 w12: U1.56@6704.7,1850.43 6735,1820.13 v1(6735,1800)
  L1 w15: v1(6751.36,1635) 6750,1633.64 6750,692.35 6991.6,450.75 L11.1@7105.58,450.75 L11.1@7108.58,450.75
  L6 w15: v1(6735,1800) 6770.2,1800 6797.2,1773 6797.2,1742.2 6751.36,1696.36 v1(6751.36,1635)
MCU_USB_D_P: L11.2 U1.57 | length 1704
  L1 w10: U1.57@6718.62,1864.35 6761,1821.97 v1(6761,1773)
  L1 w15: v1(6725.77,1635) 6727.13,1633.64 6727.13,682.87 6990.75,419.25 L11.2@7105.58,419.25 ; L11.2@7107.08,420.75 L11.2@7108.58,419.25
  L6 w15: v1(6725.77,1635) 6725.77,1703.12 6761,1738.35 v1(6761,1773)
MX0_N: J4.2 T1.13 | length 803.6
  L1 w9.84: J4.2@1395,307.64 1395,372.56 1390.08,377.48 1385,377.48 1380.08,382.4 1380.08,392.24 1385,397.17 1390.08,397.17 1395,402.09 1395,743.83 1538.81,887.64 v1(1590,887.64)
  L6 w9.84: v1(1590,887.64) 1595,892.64 T1.13@1595,980.14
MX0_P: J4.1 T1.14 | length 803.6
  L1 w9.84: J4.1@1435.16,237.56 1435.16,363.07 1420.59,377.64 1420.59,733.23 1539.72,852.35 v1(1545.28,852.35)
  L6 w9.84: T1.14@1545,980.14 1545,852.64 v1(1545.28,852.35)
MX1_N: J4.6 T1.19 | length 791.8
  L1 w9.84: J4.6@1235.55,307.64 1235.55,318.19 1285,367.64 1285,397.56 1280.08,402.48 1271.08,402.48 1266.16,407.4 1266.16,417.24 1271.08,422.17 1280.08,422.17 1285,427.09 1285,436.93 1280.08,441.85 1271.08,441.85 1266.16,446.77 1266.16,456.61 1271.08,461.54 1280.08,461.54 1285,466.46 1285,782.64 1250,817.64 1250.29,817.93 1250.29,838.55 1250.47,838.73 1250.47,844.3 1283.81,877.64 v1(1300,877.64)
  L6 w9.84: T1.19@1295,980.14 T1.19@1300.47,974.67 ; v1(1300,877.64) T1.19@1300,974.19
MX1_P: J4.3 T1.20 | length 788.2
  L1 w9.84: v1(1280,832.07) 1310.59,801.48 1310.59,367.05 1355.24,322.4 J4.3@1355.24,237.56
  L6 w9.84: T1.20@1245,980.14 1245,867.64 1280,832.64 v1(1280,832.07)
MX2_N: J4.5 T1.16 | length 1868.5
  L6 w9.84: 919.41,559.21 919.41,417.04 999.87,336.58 1001.82,336.58 1169.14,169.25 1230.6,169.25 1275.32,213.97 J4.5@1275.32,237.56 ; 919.41,576.07 960,616.66 960,1127.64 990.59,1158.23 1385.6,1158.23 1432.8,1111.03 1432.8,1034.76 1445,1022.56 T1.16@1445,980.14 ; 919.69,559.48 919.69,575.79
MX2_P: J4.4 T1.17 | length 1865.9
  L6 w9.84: J4.4@1315.08,307.64 1281.42,273.98 1260.23,273.98 1238.9,252.64 1238.9,213.74 1220,194.84 1179.74,194.84 1067.6,306.98 1067.6,313.94 1074.78,321.12 1074.78,328.08 1067.82,335.04 1060.86,335.04 1053.68,327.86 1046.72,327.86 1039.76,334.82 1039.76,341.78 1046.94,348.96 1046.94,355.92 1039.98,362.88 1033.03,362.88 1025.84,355.7 1018.88,355.7 1012.41,362.17 1010.47,362.17 945,427.64 945,548.61 945.28,548.88 945.28,565.74 985.59,606.06 985.59,1117.04 1001.19,1132.64 1375,1132.64 1407.2,1100.43 1407.2,1034.76 1395,1022.56 T1.17@1395,980.14
MX3_N: J4.8 T1.22 | length 788.2
  L1 w9.84: v1(1145,872.64) 1130,872.64 1094.41,837.05 1094.41,643.23 1157.3,580.34 1157.3,426.46 1152.38,421.54 1146.05,421.54 1141.13,416.61 1141.13,406.77 1146.05,401.85 1161.09,401.85 1166.01,396.93 1166.01,387.09 1161.09,382.17 1146.05,382.17 1141.13,377.24 1141.13,367.4 1146.05,362.48 1152.38,362.48 1157.3,357.56 1157.3,309.7 J4.8@1155.24,307.64
  L6 w9.84: v1(1145,872.64) T1.22@1145,980.14
MX3_P: J4.7 T1.23 | length 787.4
  L1 w9.84: v1(1123.94,817.64) 1120,813.7 1120,653.83 1195.39,578.43 J4.7@1195.39,237.56
  L6 w9.84: T1.23@1095,980.14 1095,846.58 v1(1123.94,817.64)
NetBT1_1: BT1.1 U13.1 | length 313.2
  L1 w12: BT1.1@4796.6,2560 4863,2626.4 U13.1@4863,2845.66
NetC1_2: C1.2 U1.74 Y1.2 | length 620.2
  L1 w10: U1.74@6955.25,2100.98 7021.23,2035 7120.51,2035 7359.16,2273.65 Y1.2@7400,2273.65 7402.31,2275.97 C1.2@7402.31,2322
NetC2_1: C2.1 U1.73 Y1.1 | length 631.9
  L1 w10: U1.73@6941.33,2087.06 7017.39,2011 7119,2011 7338.35,2230.35 Y1.1@7400,2230.35 7401.32,2229.03 C2.1@7401.32,2180
NetC3_2: C3.2 U1.64 Y2.2 | length 595.4
  L1 w12: U1.64@6816.05,1961.79 6999.84,1778 7161,1778 C3.2@7201.08,1818.08 7262.39,1818.08 Y2.2@7302.23,1778.23
NetC4_2: C4.2 U1.63 Y2.1 | length 531.7
  L1 w12: U1.63@6802.13,1947.87 6985,1765 6985,1639.84 C4.2@6996.92,1627.92 6996.92,1554.61 Y2.1@7037.77,1513.77
NetC7_2: C7.2 R4.1 R5.1 S1.1 | length 973.4
  L1 w10: S1.1@5612.6,1852.4 5670.08,1794.92 R5.1@5675.92,1794.92 5727,1846 5727,1916 5613,2030 5613,2099 R4.1@5708.08,2194.08
  L1 w12: C7.2@5337.84,2022.84 C7.2@5338.92,2023.92 5378.92,2063.92 5401.08,2063.92 S1.1@5440,2025 S1.1@5612.6,1852.4
NetC13_2: C13.2 J8.A14 | length 217.7
  L1 w10: J8.A14@2292.91,2235.34 2292.91,2167.09 2310,2150 C13.2@2310,2024.69
NetC14_2: C14.2 R6.2 R7.2 R8.2 R9.2 | length 1434.8
  L1 w10: C14.2@830,426.77 830,591.93 950.87,712.79 950.87,1255.87 977.64,1282.64 R6.2@1045,1282.64 1045.63,1282.01 R7.2@1190,1282.01 1190.32,1282.32 R8.2@1345,1282.32 R9.2@1495,1282.32
NetC28_2: C28.2 C29.2 D4.2 FB1.1 | length 474
  L1 w12: FB1.1@3480.47,1255 3480.47,1221.53 3585,1117 3585,1065 ; D4.2@3519,944.83 3519,999 3585,1065 ; C29.2@3670,1045.31 3604.69,1045.31 3585,1065
NetC34_1: C34.1 FB2.1 U15.8 | length 329.1
  L1 w25: FB2.1@1810,1282.64 1994.5,1282.64 C34.1@1995,1283.14 1995,1139.57 U15.8@1995.24,1139.33
NetC35_1: C35.1 FB3.1 U15.5 | length 676.6
  L1 w25: FB3.1@1725,869.69 2066.55,869.69 C35.1@2175,978.14 2170.5,982.64 U15.5@1995.24,982.64
NetC46_1: C46.1 R26.1 | length 45
  L6 w10: R26.1@1740,4820 C46.1@1740,4865
NetC46_2: C46.2 L9.2 Q4.5 Q4.6 Q4.7 U17.16 | length 636.1
  L1 w12: Q4.6@1640,4900 1640,4975 1660,4995 v2(1740,4995)
  L6 w12: v2(1740,4995) C46.2@1740,4904.37 1944.96,4904.37 U17.16@2056.1,5015.51
NetC47_2: C47.2 R27.2 | length 45.1
  L6 w12: C47.2@1755,5225 1755.31,5224.69 R27.2@1755.31,5180
NetC58_2: C58.2 R36.1 R37.1 | length 266.3
  L1 w20: C58.2@2525,5789.37 2680.63,5789.37 2720,5750 R36.1@2775,5750
NetC59_2: C59.2 J8.B49 R39.1 | length 3570.4
  L1 w10: J8.B49@2981.88,2484 2981.88,4036.88 v1(3100,4155) ; 3000,5789.37 3000,5545 3015.5,5529.5 3090.5,5529.5 v1(3125,5495)
  L1 w12: C59.2@2940,5789.37 3000,5789.37 R39.1@3050,5789.37
  L3 w10: v1(3100,4155) 3125,4180 v1(3125,5495)
NetC62_2: C62.2 FB4.1 S4.2
  other v1: 930,5525 960,5525 945,5545 930,5565 965,5565
NetC63_2: C63.2 F5.1 FB4.2 | length 284
  L1 w50: FB4.2@1136.02,5535 F5.1@1420,5535
NetC64_1: C64.1 R42.1 R43.1 U18.8 | length 336.1
  L1 w20: R43.1@4720,5819.37 C64.1@4775,5819.37 R42.1@4830,5819.37 5052.37,5819.37 U18.8@5055,5822
NetC67_1: C67.1 D19.2 J27.1 | length 874.2
  L1 w10: D19.2@7287.01,962.99 7570,680 7570,481.65 J27.1@7571.22,480.43 7844.57,480.43 C67.1@7845,480
NetC68_1: C68.1 U20.4 | length 153.4
  L1 w10: C68.1@5983.69,731 5990,731 6018.82,759.82 U20.4@6018.82,866.13
NetC68_2: C68.2 U20.2 | length 346.3
  L1 w10: C68.2@5944.31,731 5924,731 5895,760 5895,914 5905.2,924.2 5960.8,924.2 5967.64,917.36 U20.2@5967.64,866.13
NetC70_2: C70.2 U20.3 | length 79.9
  L1 w10: C70.2@5981.69,791 5981.69,811.69 5993.23,823.23 U20.3@5993.23,866.13
NetC71_1: C71.1 U20.6 | length 89.4
  L1 w10: U20.6@6070,866.13 6070,824 6099.69,794.32 C71.1@6099.69,789
NetC71_2: C71.2 U20.5 | length 83.7
  L1 w10: U20.5@6044.41,866.13 6044.41,825.59 6060.31,809.69 C71.2@6060.31,789
NetC72_2: C72.2 U20.7 | length 183.6
  L1 w10: U20.7@6095.59,866.13 6095.59,825.41 6102,819 6110,819 6131,798 6131,740 6117,726 C72.2@6098.69,726
NetC73_1: C73.1 U22.2 | length 305.3
  L1 w10: C73.1@5515.31,740 5489,740 5476,753 5476,901 5489.77,914.77 5528.83,914.77 5539.23,904.37 U22.2@5539.23,865
NetC73_2: C73.2 U22.4 | length 143.5
  L1 w10: C73.2@5554.69,740 5561,740 5590.41,769.41 U22.4@5590.41,865
NetC75_1: C75.1 U22.3 | length 77
  L1 w10: C75.1@5552.69,793 5552.69,810.68 5564.82,822.82 U22.3@5564.82,865
NetC76_1: C76.1 U22.5 | length 72.5
  L1 w10: U22.5@5616,865 5617.31,863.68 C76.1@5617.31,793
NetC76_2: C76.2 U22.6 | length 78.3
  L1 w10: U22.6@5641.59,865 5641.59,823.41 5656.69,808.31 C76.2@5656.69,793
NetC77_1: C77.1 U22.7 | length 142.3
  L1 w10: C77.1@5655.69,736 5677.43,757.75 5677.43,808.42 5676.37,809.49 5676.37,818.63 5667.18,827.82 U22.7@5667.18,865
NetC78_1: C78.1 U23.2 | length 335.7
  L1 w10: C78.1@4710.31,1753 4665,1798.32 4665,1912 4689.47,1936.47 4734.53,1936.47 4753.41,1917.59 U23.2@4753.41,1866
NetC78_2: C78.2 U23.4 | length 154.1
  L1 w10: C78.2@4749.69,1753 4781,1753 4786.57,1758.57 4786.57,1818.36 4804.59,1836.38 U23.4@4804.59,1866
NetC80_2: C80.2 U23.3 | length 74.2
  L1 w10: C80.2@4749.69,1804 4779,1833.29 U23.3@4779,1866
NetC81_1: C81.1 U23.5 | length 69.7
  L1 w10: C81.1@4811.58,1804 4830.18,1822.6 U23.5@4830.18,1866
NetC81_2: C81.2 U23.6 | length 65.8
  L1 w10: C81.2@4846.69,1804 4855.77,1813.09 U23.6@4855.77,1866
NetC82_2: C82.2 U23.7 | length 110.3
  L1 w10: C82.2@4879.69,1754 U23.7@4879.69,1864.32
NetD1_1: D1.1 R1.1 | length 59.7
  L1 w20: R1.1@7436.92,2049.08 7436.92,2046.08 D1.1@7477,2006
NetD2_1: D2.1 R2.1 | length 64.9
  L1 w10: R2.1@7378.92,1997.08 7383.92,1997.08 D2.1@7426.24,1954.76
NetD3_2: D3.2 R10.1 | length 76.1
  L1 w10: D3.2@785,2320 799.68,2334.68 R10.1@855,2334.68
NetD14_2: D14.2 R40.1 | length 60
  L1 w10: D14.2@2885,4780 R40.1@2885,4840
NetD15_1: D15.1 S4.1
NetD17_1: D17.1 R41.1 | length 96.5
  L1 w12: D17.1@2025,5340 2050,5340 2065,5355 R41.1@2065,5405.31
NetD20_2: D20.2 K1.12 R52.2 | length 279.5
  L1 w20: R52.2@6430,5180 6555,5180 6555,5285 K1.12@6520,5320
NetD21_2: D21.2 K2.12 R54.2 | length 224.5
  L1 w20: K2.12@5880,5325 5839.37,5284.37 R54.2@5839.37,5200 D21.2@5922.09,5200
NetD24_1: D24.1 R65.1 | length 89.8
  L1 w20: D24.1@6221.76,2698.24 6271.08,2648.92 R65.1@6271.08,2628.92
NetD25_1: D25.1 R66.1 | length 92.7
  L1 w20: D25.1@6266.76,2743.24 6311.08,2698.92 R66.1@6311.08,2668.92
NetD26_1: D26.1 R67.1 | length 87.3
  L1 w10: D26.1@5980,2400 5980,2404.06 6020.47,2404.06 6025,2408.58 6057.16,2408.58 R67.1@6057.16,2412.84
NetD27_1: D27.1 R68.1 | length 180.6
  L1 w10: D27.1@5940,2435 5920,2415 5920,2395 5965,2350 5994.32,2350 R68.1@6022.16,2377.84
NetD28_1: D28.1 R69.1 | length 89.3
  L1 w20: D28.1@6175,2655 6231.08,2598.92 R69.1@6231.08,2588.92
NetD29_1: D29.1 R70.1 | length 88.9
  L1 w20: D29.1@6126.76,2608.24 6186.08,2548.92 R70.1@6191.08,2548.92
NetF1_1: F1.1 J3.10 | length 328.8
  L1 w12: J3.10@5630,3330 5630,3225 5680,3175 5826,3175 F1.1@5831,3170
NetF2_1: F2.1 FB1.2 | length 71.5
  L1 w12: FB1.2@3539.53,1256 F2.1@3611,1256
NetF3_2: F3.2 J9.1 J9.4 | length 642.3
  L1 w50: F3.2@4205,4971 J9.4@4205,5120
  L6 w50: J9.1@3968.78,5120 3968.78,5233.78 4000,5265 4180,5265 4205,5240 J9.4@4205,5120
NetF4_2: F4.2 J10.1 J10.4 | length 635.4
  L1 w50: J10.1@3488.78,5145 3488.78,5238.78 3530,5280 3700,5280 3725,5255 J10.4@3725,5145 F4.2@3725,4977
NetJ1_B1: J1.2 R3.1 | length 315.2
  L1 w10: R3.1@5891.08,1541.08 5865,1567.16 5865,1605 6000.71,1740.71 J1.2@6000.71,1789.29
NetJ3_1: J3.1 U7.3 U10.18 | length 1090.4
  L1 w10: U7.3@4804,3193.66 4804,3319 4865,3380 4980,3380 5005,3405 5005,3522.49 5121.48,3638.98 U10.18@5171,3638.98 5438.98,3638.98 J3.1@5530,3730
NetJ3_3: J3.3 U5.3 U10.16 | length 730.9
  L1 w10: U10.16@5171,3587.8 5437.8,3587.8 5480,3630 J3.3@5530,3630 5560,3630 5615.63,3574.37 5857,3574.37 U5.3@5857,3570
NetJ3_4: J3.4 U4.3 U10.13 | length 845.4
  L1 w10: U10.13@5171,3511.02 5278.98,3511.02 v1(5315,3475) ; J3.4@5630,3630 5752,3630 U4.3@5857,3735
  L6 w10: v1(5315,3475) 5537.75,3475 5574.37,3511.62 5574.37,3574.37 J3.4@5630,3630
NetJ3_5: J3.5 U3.3 U10.14 | length 727.8
  L1 w10: U10.14@5171,3536.61 5177.61,3530 J3.5@5530,3530
  L1 w12: U3.3@5191.34,3814 5251,3814 5295,3770 v1(5295,3670)
  L6 w12: v1(5280,3535) 5285,3535 5295,3545 v1(5295,3670)
NetJ3_6: J3.6 U6.3 U10.15 | length 786
  L1 w10: U10.15@5171,3562.2 5468.2,3562.2 5489,3583 5565.74,3583 5618.74,3530 J3.6@5630,3530 5750,3530 5850,3430 U6.3@5850,3395
NetJ3_7: J3.7 U2.3 U10.12 | length 646.7
  L1 w10: U10.12@5171,3485.43 5259.57,3485.43 v1(5315,3430) J3.7@5530,3430
  L1 w12: U2.3@5207,3210 5207,3267 v1(5265,3325)
  L6 w12: v1(5265,3325) 5265,3365 5315,3415 v1(5315,3430)
NetJ3_8: J3.8 U8.3 U10.17 | length 1146.2
  L1 w10: U8.3@5022,3205 5022,3410 ; U10.17@5171,3613.39 5118.39,3613.39 5022,3517 5022,3410 ; J3.8@5630,3430 5575,3375 5057,3375 5022,3410
NetJ4_9: J4.9 J8.B2 | length 2243.7
  L1 w9.84: J4.9@1565.47,497.4 1565.47,783.11 1609.69,827.32 1609.69,935 1545,999.69 1545,1850 2056.68,2361.68 J8.B2@2056.68,2484
NetJ4_11: J4.11 J8.A8 | length 2679.7
  L1 w9.84: v1(2174.8,1895) J8.A8@2174.8,2235.34
  L3 w9.84: J4.11@1115.47,497.4 1070.31,542.56 1070.31,1585.31 1345,1860 2139.8,1860 v1(2174.8,1895)
NetJ5_19: J5.19 Q3.1 R21.1 | length 1401.7
  L1 w9.84: v1(4144.5,1290) 4148,1286.5 4174.5,1286.5 4179.41,1291.41 Q3.1@4179.41,1359.1
  L1 w10: J5.19@3686.84,497 3686.84,578.16 v1(3689.69,581.01) 3689.69,596.19 R21.1@3754,660.5
  L3 w9.84: v1@3689.69,584.69 3689.69,1194.69 3785,1290 v1(4144.5,1290)
NetJ8_A28: J8.A28 U9.2 | length 2261
  L1 w9.84: U9.2@1028,2270 1110,2270 v1(1610,2770) ; J8.A28@2568.5,2235.34 2568.5,2353.5 v1(2570,2355)
  L3 w9.84: v1(2445,2770) 2530,2770 2570,2730 v1(2570,2355)
  L6 w9.84: v1(1610,2770) v1(2445,2770)
NetJ8_A44: J8.A44 U15.2 U15.3 | length 2180.8
  L1 w9.84: U15.2@1774.76,1082.64 1774.76,1050.24 v1(1805,1020) ; v1(2685,1168) 2883.46,1366.46 J8.A44@2883.46,2235.34
  L3 w9.84: v1(1805,1020) 1822.87,1002.13 2519.13,1002.13 v1(2685,1168)
NetJ8_A47: J8.A47 R15.1 | length 2322.3
  L1 w10: J8.A47@2942.51,2235.34 2942.51,2307.51 2984,2349 3087,2349 v1(3088,2348)
  L6 w10: v1(3088,2348) 3176.58,2436.58 3850.42,2436.58 3956.76,2330.24 4146.24,2330.24 4217.48,2401.48 4217.48,2444.52 4241.98,2469.02 4606.02,2469.02 4692,2555 v1(4692,2839)
NetJ8_A63: J8.A63 U10.7 | length 2972.8
  L1 w9.84: J8.A63@3257.47,2235.34 3257.47,2357.47 v1(3260,2360) ; v1(3275,3520) 3291.61,3536.61 U10.7@4949,3536.61
  L3 w9.84: v1(3260,2360) 3260,3505 v1(3275,3520)
NetJ8_A67: J8.A67 U10.5 | length 2939
  L1 w9.84: v1(3335,2335) 3335,2236.55 J8.A67@3336.21,2235.34 ; v1(3375,3580) 3382.8,3587.8 U10.5@4949,3587.8
  L3 w9.84: v1(3335,2335) 3335,3540 v1(3375,3580)
NetJ8_A85: J8.A85 U10.3 | length 2600.3
  L1 w9.84: J8.A85@3690.54,2235.34 3690.54,2360.54 v1(3695,2365) ; v1(3796.02,3638.98) U10.3@4949,3638.98
  L3 w9.84: v1(3695,2365) 3745.31,2415.31 3745.31,3588.27 v1(3796.02,3638.98)
NetJ8_A98: J8.A98 J13.1 J21.1 P3.3 | length 6071.4
  L1 w9.84: J8.A98@3946.45,2235.34 3946.45,2346.45 3970,2370 v1(4015,2370)
  L6 w9.84: v1(4015,2370) 4042.5,2370 4124.69,2452.19 4124.69,2629.69 4379,2884 4780,2884 4893.59,2770.41 4893.59,2095.76 ; J13.1@5048,1223 4998,1273 4842,1273 4830,1285 4830,2032.17 4893.59,2095.76 ; P3.3@5814,4031 5814,2274 5635.76,2095.76 4893.59,2095.76
  L6 w12: J13.1@5048,1223 5050,1221 J21.1@5050,1111 J21.1@5050,1091
NetJ8_A99: J8.A99 J12.2 J18.2 P3.1 | length 6583.1
  L1 w9.84: J8.A99@3966.13,2235.34 3966.13,2336.13 3980,2350 v1(4060,2350)
  L1 w12: J18.2@4903,1108 J12.2@4903,1225
  L6 w9.84: 4383.14,2865.86 4140.43,2623.16 4140.43,2430.43 v1(4060,2350) 3986,2350 3942,2394 3942,2476 4375,2909 4375,3690 4463,3778 5436,3778 5727,4069 5727,4144 P3.1@5814,4231
  L6 w12: 4383.9,2865.1 4770.9,2865.1 4876.76,2759.24 4876.76,2110.4 4812,2045.64 4812,1265 4847,1230 4898,1230 J12.2@4903,1225 J18.2@4903,1108 J18.2@4903,1093
NetJ8_A101: J8.A101 U23.12 | length 7651.9
  L1 w9.84: J8.A101@4005.5,2235.34 4005.5,2310.5 4025,2330 4075,2330 v1(4135,2390)
  L1 w10: U23.12@4932.54,2123.87 4932.54,2073.54 4912,2053 4674,2053 4645,2082 4645,2333 5237,2925 5991,2925 6013,2947 v1(6013,4349)
  L3 w9.84: v1(4135,2390) 4135,4230 v1(4270,4365)
  L6 w9.84: v1(4270,4365) 5997,4365
  L6 w10: 5997,4365 v1(6013,4349)
NetJ8_A102: J8.A102 U23.10 | length 1233.8
  L1 w10: J8.A102@4025.19,2235.34 4025.19,2112.81 4109,2029 4925.1,2029 4958.13,1995.96 U23.10@4958.13,1866
NetJ8_B12: J8.B12 R37.2 | length 4342.2
  L1 w9.84: J8.B12@2253.54,2484 2253.54,2593.54 2365,2705 2435,2705 2465,2735 2465,4745 2640,4920 3075,4920 3124.25,4969.25 3124.25,5220.75 3124,5221 3124,5362 3109,5377 2735,5377 2640,5472 R37.2@2640,5750
NetJ8_B24: J8.B24 Q6.1 R33.2 | length 2903.4
  L1 w9.84: J8.B24@2489.76,2484 2489.76,4597.94 v1(2536.81,4645) Q6.1@2659.41,4767.6
  L1 w10: v1(2135,4765) 2255,4645 v1(2415,4645)
  L3 w10: v1(2415,4645) v1(2536.81,4645)
  L6 w10: R33.2@2105,4850.63 2105,4795 v1(2135,4765)
NetJ8_B32: J8.B32 R12.1 | length 2581.1
  L1 w10: J8.B32@2647.24,2484 2647.32,2484 2647.32,3993.31 3113.31,4459.31 R12.1@3526,4459.31
NetJ8_B44: J8.B44 U16.8 | length 1691.4
  L1 w10: v1(2883.46,2346.54) J8.B44@2883.46,2484
  L3 w10: v1(2883.46,2346.54) 2955,2275 2955,1088 2997,1046 v1(3202,1046)
  L6 w10: v1(3202,1046) U16.8@3203,1047
NetJ8_B54: J8.B54 U10.4 | length 2928.9
  L1 w9.84: J8.B54@3080.31,2484 3080.31,3495.31 3198.39,3613.39 U10.4@4949,3613.39
NetJ8_B57: J8.B57 U10.6 | length 2839.3
  L1 w9.84: J8.B57@3139.36,2484 3139.36,3479.36 3220.31,3560.31 4170.31,3560.31 4172.2,3562.2 U10.6@4949,3562.2
NetJ8_B63: J8.B63 U10.8 | length 2678.4
  L1 w9.84: J8.B63@3257.47,2484 3257.47,3442.47 3326.02,3511.02 U10.8@4949,3511.02
NetJ8_B95: J8.B95 R24.2 | length 136.4
  L1 w12: J8.B95@3887.39,2484 3887.39,2584.89 R24.2@3912.5,2610
NetJ29_2: J29.2 J34.1 U21.3 | length 1046.5
  L1 w20: U21.3@6560,4890 6645,4890 6730,4805 6885,4805 J29.2@7000,4920 7135,4920 7180,4875 J34.1@7180,4550
NetJ30_1: J30.1 J32.2 J33.1 U24.1 | length 1375.5
  L1 w20: J32.2@6800,4885 6885,4970 7295,4970 7315.67,4949.33 U24.1@7315.67,4885 7355,4885 v2(7380,4910) ; v2(7855,4915) J33.1@7950,4915 J30.1@8055,4915
  L6 w20: v2(7380,4910) 7385,4915 v2(7855,4915)
NetJ30_3: J30.3 J33.3 J34.3 | length 743.3
  L1 w20: J34.3@7380,4550 7545,4715 J33.3@7950,4715 J30.3@8055,4715
NetJ32_1: J32.1 U21.4 | length 242.1
  L1 w20: U21.4@6560,4990 6565,4985 J32.1@6800,4985
NetJ34_2: J34.2 R55.1 | length 110.1
  L1 w20: J34.2@7280,4550 7280.32,4550.31 R55.1@7280.32,4660
NetK1_8: K1.8 R49.1 | length 110.6
  L1 w20: R49.1@6409.37,5720 K1.8@6520,5720
NetK1_10: K1.10 R51.1 | length 112.7
  L1 w20: R51.1@6409.37,5515 6515,5515 K1.10@6520,5520
NetK2_8: K2.8 R50.1 | length 109.1
  L1 w20: R50.1@5775,5715 5870,5715 K2.8@5880,5725
NetK2_10: K2.10 R53.1 | length 107.4
  L1 w20: R53.1@5774.69,5520 5779.69,5525 K2.10@5880,5525
NetLS1_2: LS1.2 R11.2 | length 461.3
  L1 w10: R11.2@3552.37,4626 3880,4626 3915.48,4590.52 LS1.2@3915.48,4507
NetLS2_2: LS2.2 Q7.3 | length 368.4
  L1 w10: Q7.3@7192.4,2385 7274,2385 7399,2510 LS2.2@7399,2620
NetP4_1: P4.1 R45.1 U1.59 | length 2538.2
  L1 w10: P4.1@6136,4092 6136,3965.69 R45.1@6146,3955.69 6216.59,3885.09 6216.59,2946.67 6581.2,2582.06 6581.2,2492 6478,2388.8 6478,2163.87 6746.45,1895.41 U1.59@6746.45,1892.19
NetP4_3: P4.3 R46.1 U1.58 | length 2581.8
  L1 w10: 6336,3983.69 6236,3883.69 6236,2957.49 6597.11,2596.39 6597.11,2485.11 6495,2383 6495,2179.67 v1(6710.76,1963.91)
  L1 w12: P4.3@6336,4092 6336,3983.69 R46.1@6358,3961.69 ; v1(6705,1905) 6705.81,1905 U1.58@6732.53,1878.27
  L6 w10: v1(6705,1905) 6710.76,1910.76 v1(6710.76,1963.91)
NetQ1_1: Q1.1 R12.2 | length 88.3
  L1 w10: Q1.1@3450.4,4529.41 3495.28,4529.41 R12.2@3526,4498.69
NetQ1_3: Q1.3 R11.1 | length 192.9
  L1 w10: Q1.3@3375.6,4555 3375.6,4599.6 3402,4626 R11.1@3513,4626
NetQ2_1: Q2.1 Q3.3 R23.2 | length 176.7
  L1 w9.84: Q2.1@4173.82,1491.5 4173.82,1465.08 Q3.3@4205,1433.9
  L1 w25: Q3.3@4205,1433.9 4307.1,1433.9 R23.2@4310,1431
NetQ2_3: Q2.3 R22.2 U14.30 | length 859
  L1 w9.84: U14.30@4145,1035.16 4201.51,1035.16 4220.89,1054.54 4291.54,1054.54 4369,1132 4369,1551 4353.7,1566.3 Q2.3@4199.41,1566.3
NetQ4_1: Q4.1 U17.15 | length 403
  L1 w12: Q4.1@1880.24,4790 2045,4790 2060,4805 v2(2060,4960)
  L6 w12: v2(2060,4960) 2060,4970 2075.79,4985.79 U17.15@2075.79,5007.51 U17.15@2075.79,5015.51
NetQ4_4: Q4.4 U17.18 | length 229.9
  L1 w12: v2(1880,4990) 1880,4940.24 Q4.4@1880.24,4940
  L6 w12: v2(1880,4990) 1950.79,5060.79 U17.18@2022.51,5060.79 U17.18@2030.51,5060.79
NetQ6_3: Q6.3 R40.2 | length 161.6
  L1 w10: Q6.3@2685,4842.4 2843.23,4842.4 R40.2@2845.63,4840
NetQ8_1: Q8.1 R56.2 | length 80.1
  L1 w20: R56.2@6275,5369.69 6275.31,5370 Q8.1@6355,5370
NetQ8_3: Q8.3 R52.1 | length 125.1
  L1 w20: Q8.3@6429.8,5344.41 6429.8,5219.57 R52.1@6430,5219.37
NetQ9_1: Q9.1 R57.2 | length 234.2
  L1 w10: Q9.1@5502.6,5509.59 5538,5474.19 5538,5385 5566,5357 R57.2@5621.31,5357
NetQ9_3: Q9.3 R54.1 | length 469.7
  L1 w10: Q9.3@5577.4,5484 5737,5484 5800,5421 R54.1@5800,5200
NetR1_2: R1.2 U1.71 | length 609.5
  L1 w12: U1.71@6913.49,2059.22 7023,1949.71 7204.71,1949.71 7351,2096 7390,2096 R1.2@7409.08,2076.92
NetR2_2: R2.2 U1.70 | length 551.8
  L1 w12: U1.70@6899.57,2045.3 7030.87,1914 7240.16,1914 R2.2@7351.08,2024.92
NetR10_2: R10.2 U9.4 | length 97.4
  L1 w10: R10.2@855.01,2294.69 951.09,2294.69 U9.4@952,2295.59
NetR15_2: R15.2 U13.3 | length 63.1
  L1 w12: R15.2@4704,2886.69 4766.69,2886.69 U13.3@4767,2887
NetR18_1: R18.1 U14.32 | length 112.9
  L1 w9.84: U14.32@4145,1074.53 4200.53,1074.53 4212.31,1086.32 R18.1@4253,1086.32
NetR25_1: R25.1 U17.19 | length 1193
  L6 w12: U17.19@2030.51,5080.47 U17.19@2022.51,5080.47 1915.47,5080.47 1861.59,5026.59 1726.91,5026.59 1708.41,5008.09 1708.41,4763.41 1766.82,4705 2215,4705 2240.32,4730.31 R25.1@2240.32,4760
NetR26_2: R26.2 U17.17 | length 453.8
  L1 w12: v2(1820,4830) 1820,4998.18 1843.41,5021.59 1893.09,5021.59 1904.68,5010 v2(1950,5010)
  L6 w12: R26.2@1779.37,4820 1810,4820 v2(1820,4830) ; v2(1950,5010) 1950,5015 1976.1,5041.1 U17.17@2022.51,5041.1 U17.17@2030.51,5041.1